# Altium PCB asar_feather.PcbDoc (part 5 of 5)
Units mm, origin at the board's own origin, x right, y up, seen from the top; angles counter-clockwise.
Board outline 50.8 x 22.86 mm, 6 copper layers (Top Layer, L2-GND, L3-SIG, L4-SIG, L5-VCC3V3, Bottom Layer), stack 1.568 mm thick; 181 components, 156 nets, 840 pads, 1779 vias.
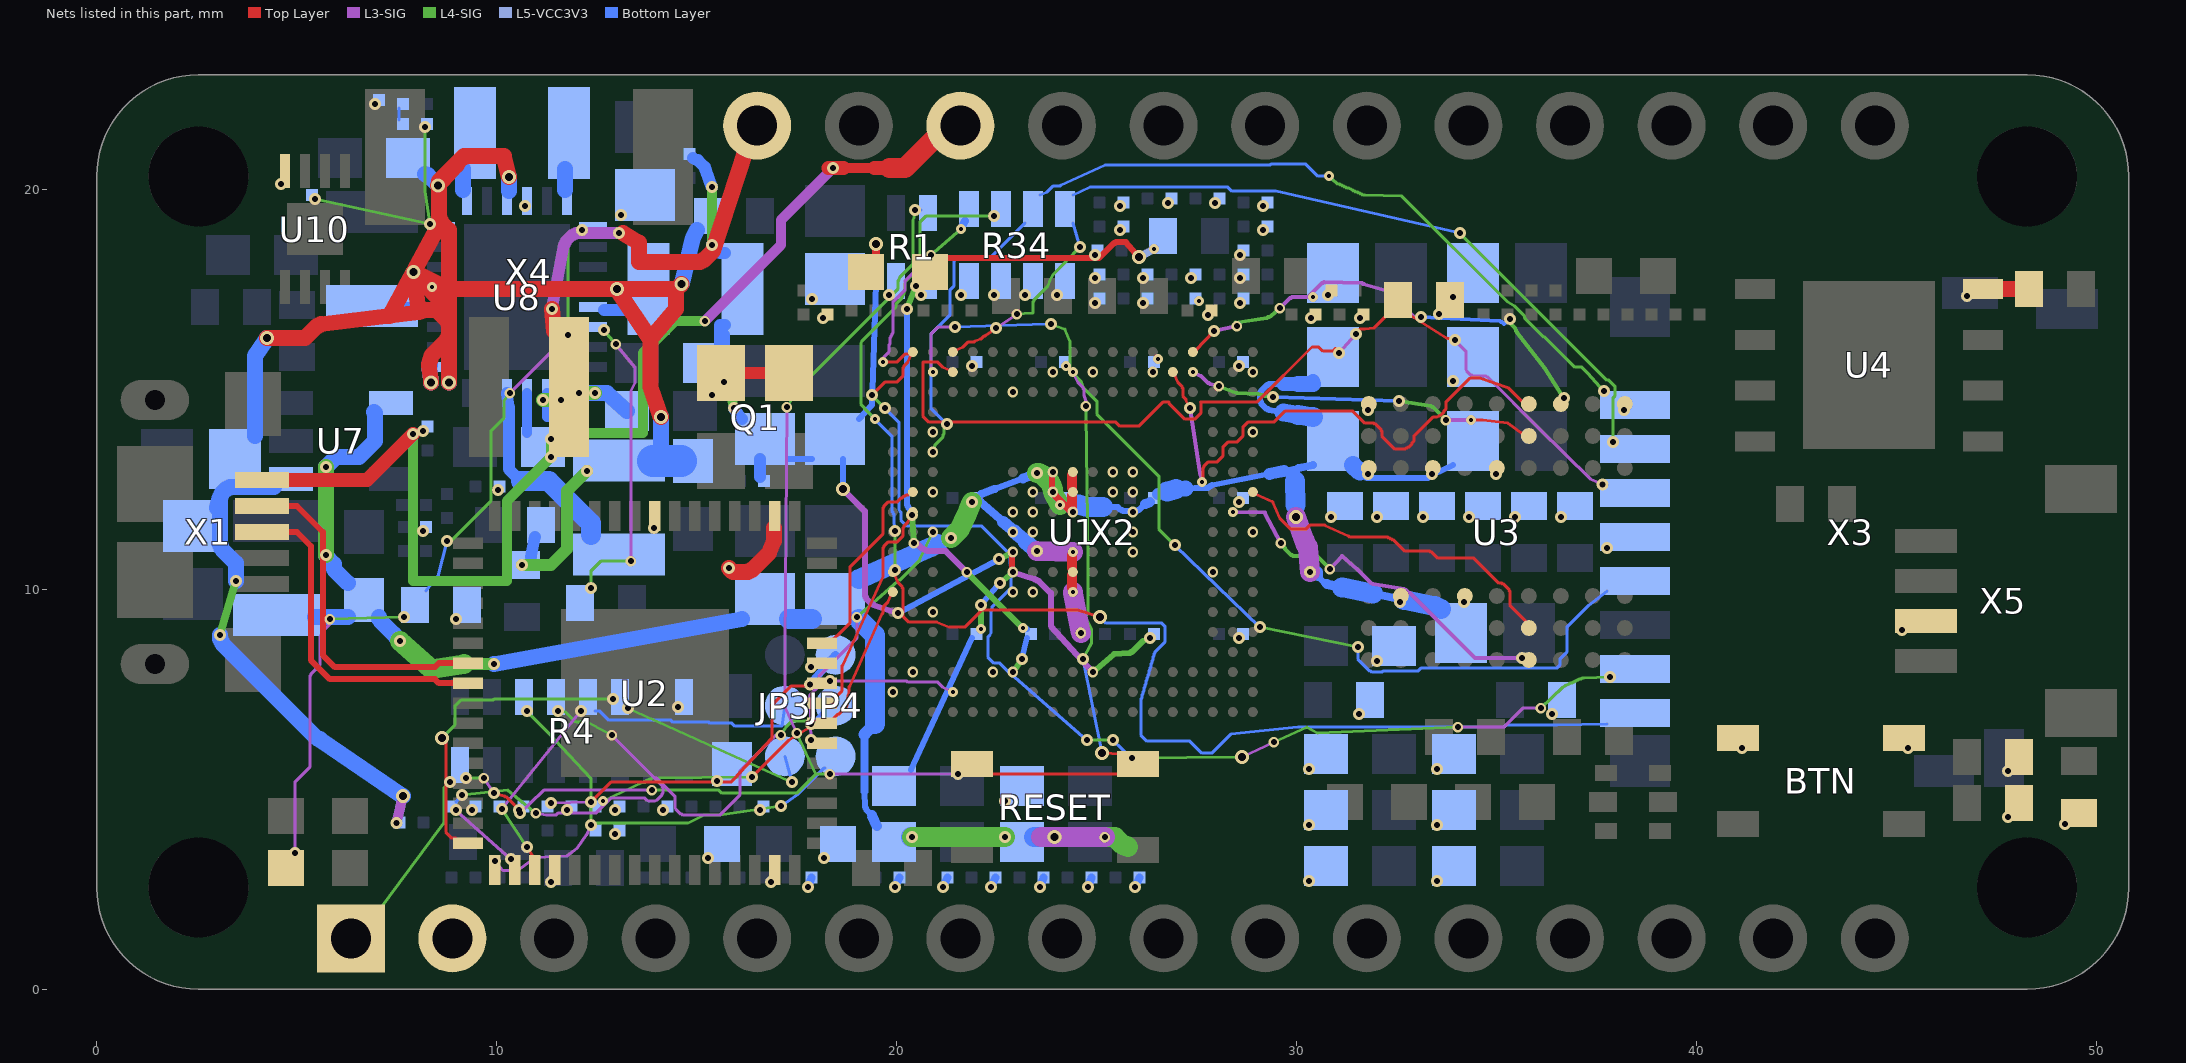
[diagram p8: the nets of this part, all layers, seen from the top]

## Via types
v1: diameter 0.27, hole 0.15, L3-SIG to L4-SIG, tented both sides, 307 vias
v2: diameter 0.3, hole 0.15, L5-VCC3V3 to Bottom Layer, tented both sides, 286 vias
v3: diameter 0.3, hole 0.15, L4-SIG to L5-VCC3V3, tented both sides, 241 vias
v4: diameter 0.3, hole 0.15, Top Layer to L2-GND, tented both sides, 219 vias
v5: diameter 0.3, hole 0.15, L2-GND to L3-SIG, tented both sides, 201 vias
v6: diameter 0.25, hole 0.1, Top Layer to L2-GND, tented both sides, 177 vias
v7: diameter 0.25, hole 0.1, L2-GND to L3-SIG, tented both sides, 125 vias
v8: diameter 0.35, hole 0.2, Top Layer to Bottom Layer, tented both sides, 109 vias
v9: diameter 0.25, hole 0.1, L4-SIG to L5-VCC3V3, tented both sides, 64 vias
v10: diameter 0.25, hole 0.1, L5-VCC3V3 to Bottom Layer, tented both sides, 46 vias
v11: diameter 0.3, hole 0.15, L3-SIG to L4-SIG, tented both sides, 4 vias

## Nets (pads, with @x,y where several pads share a name; then routed paths per layer and width w, separated by ;. In a path a pad name is that pad's centre, name@x,y a point inside that pad or via, vN(x,y) a via of type N, cw(c..) or ccw(c..) an arc to the next point about the centre after c; other vN are vias at no path point) (continued)
PWR_PGOODALL: LD3.A R107.2 U8.15 | length 18.7
  Top Layer w0.076: LD3.A@4.95,3.375 v4(4.95,3.4)
  L3-SIG w0.076: v4(4.95,3.4) 4.95,5.175 5.325,5.55 5.325,7.825 5.35,7.85 5.35,7.875 5.575,8.1 5.575,8.8 5.6,8.825 5.6,8.85 5.625,8.875 5.625,8.9 5.675,8.95 5.675,8.975 5.825,9.125 v1(5.825,9.25) ; v1(10.325,14.9) v1(11.775,16.35)
  L4-SIG w0.076: v1(5.825,9.25) v3(7.675,9.3) ; v3(8.75,11.2) 8.85,11.2 9.85,12.2 9.85,12.3 9.85,13.95 10.175,14.275 10.175,14.7 v1(10.325,14.9) ; v1(11.775,16.35) 11.775,18.625 v3(12.125,18.975)
  Bottom Layer w0.076: R107.2@8.225,9.95 8.525,10.325 v3(8.75,11.2)
  other v2: 7.675,9.3 8.75,11.2 12.125,18.975
  other v5: 4.95,3.4
PWR_PROG: R102.1 U8.20 | length 7.6
  L3-SIG w0.076: v1(12.975,16.125) 13.45,15.55 13.45,15.15 13.35,14.95 v1(13.35,10.7)
  L4-SIG w0.076: v3(12.35,10.025) 12.35,10.45 12.6,10.7 v1(13.35,10.7) ; v3(12.675,16.475) v1(12.975,16.125)
  Bottom Layer w0.076: R102.1@12.35,10 v3(12.35,10.025)
  other v2: 12.35,10.025 12.675,16.475
PWR_SW: L8.1 U8.26 | length 4.8
  Bottom Layer w0.3: U8.26@10.25,14.9 10.3,14.55 10.3,13 10.6,12.7
  Bottom Layer w0.5: 10.6,12.7 11.3,12.7 12.35,11.65 L8.1@12.35,11.35
PWR_SW1: L9.1 U8.4 | length 0.5
  Bottom Layer w0.4: L9.1@7.775,16.975 U8.4@8.325,16.975
PWR_SW2: L2.1 U8.19 | length 0.7
  Bottom Layer w0.3: U8.19@12.675,16.975 13.225,16.975 L2.1@13.35,16.975
PWR_SWAB3: L1.1 U8.9 | length 0.5
  Bottom Layer w0.4: U8.9@9.15,19.975 L1.1@9.15,20.5
PWR_SWCD3: L1.2 U8.14 | length 0.5
  Bottom Layer w0.4: U8.14@11.7,19.975 L1.2@11.7,20.5
PWR_VC3: C164.2 R117.1 U8.8 | length 5.4
  L4-SIG w0.076: v3(5.45,19.75) v3(8.325,19.125) 8.2,19.95 v3(8.2,21.55)
  other v2: 8.325,19.125 5.45,19.75 8.2,21.55
PWR_VC3_RC: C165.1 R117.2 | length 0.3
  Bottom Layer w0.076: R117.2@7.55,21.725 C165.1@7.55,22.025
RAS#: U1.V4 U3.F8 | length 8.7
  Top Layer w0.076: v6(34.35,14.225) 34.65,14.225 35.275,14.15 U3.F8@35.65,13.875
  L3-SIG w0.1: v7@27.4,15.425 27.6,15.325 27.775,15.15 27.8,15.15 27.825,15.125 v1(28.05,15.075) ; v1(33.725,14.225) v6(34.35,14.225)
  L4-SIG w0.1: v1(28.05,15.075) 28.5,14.9 29.025,14.875 29.175,14.85 29.2,14.825 29.225,14.825 v3(29.4,14.8) ; v3(32.55,14.7) 33.35,14.575 33.375,14.55 33.4,14.55 v1(33.725,14.225)
  Bottom Layer w0.1: v3(29.4,14.8) v3(32.55,14.7)
  other v2: 32.55,14.7 29.4,14.8
  other v6: 27.4,15.43
  other v7: 34.35,14.225 27.4,15.43
RST#: R1.2 R4.16 RESET.1 RESET.2 U1.V10 X2.1 | length 46.5
  Top Layer w0.076: v4(9.925,4.9) 10.175,4.825 10.2,4.825 10.225,4.8 10.25,4.8 10.425,4.625 v4(10.575,4.4) ; RESET.1@22.275,5.375 RESET.2@25.625,5.375 ; v8(25.125,5.9) RESET.2@25.625,5.875
  L3-SIG w0.076: v1(9.675,5.275) v4(9.925,4.9) ; v4(10.575,4.4) 11.15,4.95 11.175,4.975 v1(13.875,4.975) ; v1(17.25,14.55) 17.2,8.55 17.2,7.425 17.175,7.4 17.175,7.125 v1(17.5,6.4) ; v1(18.325,5.375) v4(21.525,5.375) ; v7@24.4,15.425 24.525,15.175 24.65,15.05 24.65,15.025 24.675,15 24.675,14.85 24.725,14.7 v1(24.725,14.575)
  L4-SIG w0.076: X2.1@7.025,1.925 8.675,4.15 8.675,5.025 v3(8.825,5.175) ; v3(9.225,5.275) v1(9.675,5.275) ; v1(13.875,4.975) 15.55,4.975 15.625,4.9 17.5,4.9 17.975,5.375 ; v1(17.25,14.55) 17.575,15.05 20.025,17.5 20.025,17.7 20.05,17.725 20.05,17.75 20.075,17.8 20.4,18.125 20.4,19.225 20.425,19.275 v3(20.45,19.475) ; v1(17.5,6.4) 17.975,5.375 ; v1(18.325,5.375) 17.975,5.375 ; v3(24.65,8.25) 24.87,8.65 24.87,9 24.725,9.3 24.75,9.35 24.775,9.4 24.775,10.775 24.729,14.406 ; 24.725,14.4 v1(24.725,14.575)
  Bottom Layer w0.076: v3(8.825,5.175) R4.16@8.9,5.25 ; v3(20.45,19.475) R1.2@20.6,19.475 ; v3(24.65,8.25) v8(25.125,5.9)
  other v2: 8.825,5.175 9.225,5.275 24.65,8.25 20.45,19.475
  other v5: 10.575,4.4 9.925,4.9 21.525,5.375
  other v6: 24.4,15.43
  other v7: 24.4,15.43
SD-CLK: U1.V17 X3.5 | length 24.3
  L3-SIG w0.076: v7@20.9,15.425 20.85,15.475 20.85,16.375 21.025,16.55 v3(21.45,16.55)
  L4-SIG w0.076: v3(23.85,16.625) 24.2,16.5 24.325,16.2 ; 24.325,16.21 24.325,15.475 24.61,15.19 ; 24.6,15.2 24.65,15.05 25,14.7 25,14.375 26.55,12.825 26.55,11.5 v3(26.95,11.1) ; v3(29.075,9.05) v3(31.525,8.55)
  Bottom Layer w0.076: v3(21.45,16.55) 23.775,16.625 v3(23.85,16.625) ; v3(26.95,11.1) v3(29.075,9.05) ; v3(31.525,8.55) 31.525,8.25 31.825,7.95 31.85,7.95 31.875,7.925 32.125,7.925 32.15,7.95 33.025,7.95 33.1,8.025 36.5,8.025 36.575,8.1 36.575,8.25 36.75,8.425 36.75,9.05 37.3,9.6 X3.5@37.75,9.95
  other v1: 21.45,16.55
  other v2: 31.525,8.55 29.075,9.05 26.95,11.1 21.45,16.55 23.85,16.625
  other v6: 20.9,15.43
  other v7: 20.9,15.43
SD-CMD: R35.1 U1.V16 X3.3 | length 22.6
  Top Layer w0.076: U1.V16@21.325,15.475 21.15,15.55 21.025,15.675 20.65,15.675 20.65,14.325 20.8,14.175 25.475,14.175 25.575,14.075 26.05,14.075 26.65,14.675 26.801,14.675 ; 26.8,14.675 26.8,14.65 27.2,14.25 27.45,14.25 27.6,14.4 27.6,14.675 29,14.675 30.382,16.057 ; 30.375,16.05 30.55,16.05 30.65,15.95 30.9,15.95 v4@30.971,16.021 ; v4@30.95,16 v4(31.05,15.9) ; v4(31.475,16.375) 31.475,16.4 31.575,16.5 ; 31.587,16.5 31.7,16.5 31.925,16.525 R35.1@32.275,16.875 ; R35.1@32.8,16.875 33.75,16.271 ; 33.75,16.275 v4(33.95,16.225)
  L3-SIG w0.076: v4(31.05,15.9) v4(31.475,16.375) ; v4(33.95,16.225) 34.225,15.95 34.225,15.5 34.25,15.45 34.35,15.35 34.375,15.35 34.4,15.325 34.725,15.325 34.775,15.3 ; 34.77,15.305 36.05,14.025 37.35,12.75 v1(37.645,12.62)
  Bottom Layer w0.076: v1(37.645,12.62) X3.3@37.75,12.6
  other v2: 37.645,12.62
  other v3: 37.645,12.62
  other v5: 31.05,15.9 33.95,16.225 31.475,16.375
SD-DAT0: R34.1 U1.W18 X3.7 | length 33.2
  Top Layer w0.076: v1(19.375,14.85) 19.7,15.175 20,15.175 20.15,15.325 20.15,15.525 20.175,15.55 20.175,15.575 20.275,15.675 U1.W18@20.35,15.85 ; v6(19.65,15.675) 20,15.675 20.2,15.875 U1.W18@20.325,15.875
  L3-SIG w0.076: v6(19.65,15.675) 19.675,15.8 19.8,15.925 19.8,16.1 19.825,16.125 19.825,16.275 19.85,16.3 19.85,16.325 19.875,16.35 19.875,16.375 19.9,16.4 19.9,17.175 20.2,17.475 20.2,17.7 v1(20.85,18.35) ; v8(28.625,5.8) v1(29.425,6.175) ; v1(34.025,6.55) 35.175,6.55 35.65,7.025 v1(36.1,7.025)
  L4-SIG w0.076: v1(19.375,14.85) v3(19.7,14.525) ; v1(20.85,18.35) v9(21.6,19) ; v3(24.75,6.225) v3(25.4,6.225) ; v3(25.875,5.775) v8(28.625,5.8) ; v1(29.425,6.175) 30.25,6.55 30.525,6.4 v1(34.025,6.55) ; v1(36.1,7.025) 36.65,7.55 36.7,7.575 36.725,7.6 36.75,7.6 36.8,7.625 36.825,7.65 36.875,7.65 36.9,7.675 36.925,7.675 36.95,7.7 36.975,7.7 37,7.725 37.025,7.725 37.05,7.75 37.1,7.75 37.125,7.775 37.175,7.775 v3(37.825,7.8)
  Bottom Layer w0.076: v3(19.7,14.525) 20.05,14.175 20.05,12 20.075,11.95 20.1,11.925 20.1,11.725 20.25,11.575 22.125,11.575 22.825,10.875 22.825,10.625 22.85,10.6 22.85,10.025 22.375,9.55 22.375,9.475 22.35,9.45 22.35,8.9 22.325,8.85 22.275,8.8 22.275,8.3 22.425,8.15 22.575,8.15 22.9,7.825 22.95,7.8 v3(24.75,6.225) ; v3(25.4,6.225) v3(25.875,5.775)
  Bottom Layer w0.2: v9(21.6,19) R34.1@21.7,19.2
  other v2: 25.875,5.775 24.75,6.225 25.4,6.225 37.825,7.8 19.7,14.525
  other v4: 19.375,14.85
  other v5: 19.375,14.85
  other v7: 19.65,15.675
  other v10: 21.6,19
SD-DAT1: R34.2 U1.H19 X3.8 | length 34.6
  Top Layer w0.076: U1.H19@19.95,10.35 20.025,10.175 20.125,10.075 20.125,10.05 20.15,10.025 20.15,9.325 20.3,9.175 21,9.175 21.312,9.05 21.7,9.05 22.125,9.475 24.525,9.475 v8(25.075,9.3)
  L4-SIG w0.076: v9(19.45,14.25) 19.1,14.625 19.1,16.15 19.125,16.2 19.975,17.05 19.975,17.125 20.125,17.275 20.125,17.3 20.15,17.325 20.15,17.35 20.175,17.375 20.175,17.425 20.2,17.45 20.2,17.65 20.225,17.7 20.575,18.05 20.575,19.175 20.725,19.325 v3(22.425,19.325) ; v4(19.95,10.475) v3(19.95,11.45)
  Bottom Layer w0.076: v9(19.45,14.25) 19.875,13.825 19.875,11.95 19.9,11.925 19.9,11.9 19.925,11.875 19.925,11.675 v3(19.95,11.45) ; v8(25.075,9.3) 25.225,9.15 26.625,9.15 26.7,9.075 26.7,8.675 26.45,8.425 26.45,8.4 26.425,8.375 26.425,8.325 26.4,8.3 26.4,8.225 26.375,8.2 26.375,8.15 26.35,8.125 26.35,8.05 26.325,8.025 26.325,7.975 26.3,7.95 26.3,7.875 26.275,7.85 26.275,7.8 26.25,7.775 26.25,7.725 26.225,7.7 26.225,7.625 26.2,7.6 26.2,7.55 26.175,7.525 26.175,7.45 26.15,7.425 26.15,7.375 26.125,7.35 26.125,7.275 26.1,7.25 26.1,6.35 26.25,6.2 27.325,6.2 27.625,5.9 27.875,5.9 28.35,6.375 30.025,6.55 35.175,6.55 35.225,6.6 36.5,6.6 X3.8@37.75,6.625
  other v1: 19.95,10.475
  other v2: 19.95,11.45 22.425,19.325
  other v5: 19.95,10.475
  other v10: 19.45,14.25
SD-DAT2: R34.3 U1.P17 X3.1 | length 24.2
  L4-SIG w0.076: v1@20.9,13.425 20.95,13.6 21.15,13.8 21.15,13.85 21.175,13.875 21.175,14.05 v3(21.25,14.125) ; v9(30.8,20.325) 31,20.15 31.025,20.125 31.075,20.125 31.1,20.1 31.125,20.1 31.15,20.075 31.175,20.075 31.2,20.05 31.225,20.05 31.25,20.025 31.3,20.025 31.35,20 31.4,19.975 31.425,19.95 31.45,19.95 31.475,19.925 31.525,19.925 31.55,19.9 31.575,19.9 31.6,19.875 31.625,19.875 31.65,19.85 31.7,19.85 32.625,19.825 35.253,17.197 ; 35.25,17.2 35.45,17.075 35.675,16.85 35.7,16.775 36.175,16.3 36.2,16.3 36.95,15.55 37.125,15.55 37.275,15.4 v3(37.675,14.95)
  Bottom Layer w0.076: v3(21.25,14.125) 20.85,14.525 20.85,16.375 21.325,16.85 21.325,17.475 21.425,17.575 21.425,18.2 21.5,18.275 22.325,18.275 R34.3@23.2,19.15 ; R34.3@23.575,19.85 23.75,19.925 23.9,20.075 24.075,20.075 24.1,20.1 25.2,20.6 29.325,20.6 29.35,20.625 30.225,20.625 30.525,20.325 v9(30.8,20.325) ; v3(37.675,14.95) X3.1@37.75,14.875
  other v1: 20.9,13.43
  other v2: 21.25,14.125 37.675,14.95
  other v6: 20.9,13.43
  other v7: 20.9,13.43
  other v10: 30.8,20.325
SD-DAT3: R34.4 U1.W16 X3.2 | length 21.7
  Top Layer w0.076: U1.W16@21.475,15.975 21.65,16.05 21.775,16.175 21.925,16.175 21.95,16.2 22.075,16.25 22.1,16.25 22.175,16.325 22.2,16.325 22.225,16.35 v4(22.475,16.525)
  L3-SIG w0.076: v4(22.475,16.525) v1(23,16.875)
  L4-SIG w0.076: v1(23,16.875) 23.375,16.9 23.4,16.9 23.4,17.175 23.425,17.2 23.425,17.225 23.775,17.575 23.825,17.7 ; 23.813,17.7 23.9,17.85 ; 23.903,17.861 v3(24.575,18.55) ; v3(34.075,18.9) 37.75,15.225 37.8,15.225 37.95,15.075 37.95,14.825 37.9,14.775 v3(37.9,13.675)
  Bottom Layer w0.076: R34.4@24.4,19.15 v3(24.575,18.55) ; R34.4@24.4,19.85 24.825,20.05 28.275,20.05 28.375,19.95 29.475,19.95 v3(34.075,18.9)
  other v2: 37.9,13.675 24.575,18.55 34.075,18.9
  other v5: 22.475,16.525
SDRAM-CLK: U1.M1 U3.F2 | length 8.4
  Top Layer w0.076: U1.M1@28.975,12.375 29.392,12.187 ; 29.4,12.175 29.575,11.775 29.85,11.5 30.225,11.5 30.325,11.6 30.7,11.6 ; 30.692,11.6 31.3,11.325 31.325,11.3 32.275,11.3 32.3,11.275 32.325,11.275 32.35,11.25 32.375,11.25 32.4,11.225 32.425,11.225 32.7,10.95 33.325,10.95 33.35,10.925 33.375,10.925 33.525,10.775 34.425,10.775 35.05,10.15 35.125,10.15 35.15,10.125 35.175,10.125 35.3,10 35.3,9.975 35.325,9.95 35.325,9.6 U3.F2@35.75,9.175
SDRAM-CS#: U1.W4 U3.G9 | length 11.3
  Top Layer w0.076: U1.W4@27.475,15.975 v4(27.925,16.45)
  L3-SIG w0.1: v4(27.925,16.45) v1(28.5,16.575) ; v1(29.575,17.025) 29.825,17.275 29.85,17.275 29.875,17.3 30.275,17.3 30.625,17.65 30.65,17.65 30.675,17.675 31.625,17.65 31.65,17.625 31.675,17.625 32.2,17.475 32.225,17.45 32.25,17.45 32.3,17.425 32.925,16.8 v3(33.1,16.8)
  L4-SIG w0.1: v1@28.473,16.662 29.25,16.775 29.275,16.8 29.3,16.8 29.35,16.825 v1(29.575,17.025) ; v1@28.475,16.65 v1(28.5,16.575) ; v3(35.325,16.75) 35.325,16.65 35.45,16.525 35.475,16.475 35.475,16.45 35.5,16.425 36.2,15.52 v4(36.675,14.775)
  Bottom Layer w0.1: v3(33.1,16.8) 35.075,16.7 35.1,16.675 35.125,16.675 35.175,16.625 v3(35.325,16.75)
  other v1: 36.675,14.775 33.1,16.8
  other v2: 35.325,16.75 33.1,16.8
  other v5: 36.675,14.775 27.925,16.45
TCK: JP3.1 R4.6 U2.16 | length 12.9
  Top Layer w0.076: v8(8.625,6.275) 8.725,6.175 8.725,3.925 8.875,3.775 8.975,3.775 U2.16@9,3.75
  L4-SIG w0.076: v8(8.625,6.275) 8.95,6.6 8.95,7.075 9.1,7.225 9.9,7.225 9.925,7.25 v3(12.9,7.25) ; v3(13.275,7.025) v3(17.375,5.175)
  Bottom Layer w0.076: R4.6@13.25,7.025 v3(13.275,7.025) ; JP3.1@17.2,5.82 v3(17.375,5.175)
  other v2: 17.375,5.175 13.275,7.025 12.9,7.25
TDI: JP4.1 R4.3 R90.1 U2.17 | length 12.8
  L3-SIG w0.076: v4(9.95,3.2) 10.15,2.97 10.53,2.97 10.95,3.29 11.75,3.33 11.94,3.47 12.01,3.53 12.24,3.85 v3(12.35,4.1)
  L4-SIG w0.076: v3(10.75,6.95) 11.275,6.425 12.35,5.275 v3(12.35,4.1) ; v1@12.35,4.15 14.775,4.15 15.175,4.35 15.575,4.35 v3(17.1,4.575)
  Bottom Layer w0.076: R90.1@12.35,4.075 v3(12.35,4.1) ; v3(17.1,4.575) 17.525,4.875 18.175,5.525 JP4.1@18.2,5.525
  other v1: 12.35,4.1
  other v2: 12.35,4.1 17.1,4.575 10.75,6.95
  other v5: 9.95,3.2
TDO: JP4.2 R4.4 R91.1 U2.18 | length 17.3
  L3-SIG w0.076: v1(8.975,4.475) v4(10.35,3.25) ; v1(10.975,4.4) 11.225,4.35 11.475,4.35 11.525,4.4 12.475,4.4 12.85,4.775 13.7,4.775 13.75,4.725 13.8,4.7 13.95,4.7 14,4.725 14.125,4.85 14.125,4.875 14.15,4.9 14.15,5.05 14.125,5.075 14.125,5.1 v1(12.875,6.35) ; 13.95,5.275 14,5.275 14.45,4.825 14.45,4.55 14.475,4.5 14.6,4.375 14.625,4.375 14.65,4.35 15.575,4.35 16.075,4.85 16.075,5.45 16.975,6.35 v1(17.1,6.35)
  L4-SIG w0.076: v3(9.125,4.85) 10.275,4.975 v1(10.975,4.4) ; v3(11.525,6.95) 11.725,6.925 11.975,6.675 12.275,6.675 v1(12.875,6.35) ; v1(17.1,6.35) 17.2,6.5 17.225,6.55 17.35,6.675 17.4,6.7 17.775,6.7 v3(17.85,6.625)
  Bottom Layer w0.076: R91.1@8.975,4.675 v3(9.125,4.85) ; v3(17.85,6.625) JP4.2@18.125,6.9
  other v2: 8.975,4.475 9.125,4.85 17.85,6.625 11.525,6.95
  other v3: 8.975,4.475
  other v5: 10.35,3.25
TMS: JP3.2 R4.5 R92.1 U2.19 | length 10
  Top Layer w0.076: v4(10.75,3.55) U2.19@10.95,3.25
  L3-SIG w0.076: v3(10.125,4.5) v1(12.1,6.95)
  L4-SIG w0.076: v3(10.125,4.5) v4(10.75,3.55)
  Bottom Layer w0.076: R4.5@12.45,6.95 12.575,6.95 12.8,6.725 14.35,6.725 14.4,6.675 15.3,6.675 15.325,6.65 15.875,6.65 15.95,6.575 17.125,6.575 JP3.2@17.2,7.09
  other v1: 10.75,3.55 10.125,4.5
  other v2: 10.125,4.5 12.1,6.95
  other v3: 12.1,6.95
  other v5: 10.75,3.55
UART_FT_CTS#: R93.1 U1.B16 U2.41 | length 11.4
  Top Layer w0.076: v4(12.35,4.675) 12.85,5.175 15.85,5.175 15.925,5.25 16.875,6.275 16.875,7.1 17.35,7.575 U2.41@17.85,7.575
  L3-SIG w0.076: v1(11.35,4.65) v4(12.35,4.675) ; v4(18.325,7.7) 20.25,7.7 20.275,7.675 21.025,7.675 21.15,7.55 v7@21.4,7.425
  other v2: 11.35,4.65
  other v3: 11.35,4.65
  other v5: 12.35,4.675 18.325,7.7
  other v6: 21.4,7.43
  other v7: 21.4,7.43
UART_FT_DTR#: U1.M18 U2.43 | length 4.6
  Top Layer w0.076: U2.43@18.4,8.75 18.55,8.875 18.825,9.15 18.825,10.55 19.65,11.375 19.65,12.025 19.675,12.05 19.675,12.075 19.775,12.175 20,12.175 20.1,12.275 20.125,12.275 20.175,12.325 20.2,12.325 20.225,12.35 20.275,12.35 20.3,12.375 U1.M18@20.325,12.375
UART_FT_RTS#: U1.L18 U2.40 | length 5.3
  Top Layer w0.076: U2.40@18.4,7.25 18.55,7.375 18.625,7.45 18.625,8.075 18.65,8.1 19.65,10.3 19.65,11.025 19.675,11.05 19.675,11.075 19.775,11.175 20,11.175 20.15,11.325 20.15,11.525 20.175,11.55 20.175,11.575 20.275,11.675 U1.L18@20.35,11.85
UART_FT_RXD: R94.1 U1.G19 U2.39 | length 9.4
  Top Layer w0.076: v4(16.375,5.3) 17.3,6.225 17.825,6.55 U2.39@17.85,6.55 ; U2.39@18.4,6.75 18.525,6.875 18.55,6.875 18.75,7.075 18.775,7.35 18.8,7.4 18.8,7.55 18.825,7.575 19.625,9.375 19.65,9.4 19.65,9.525 19.675,9.55 19.675,9.575 19.775,9.675 U1.G19@19.85,9.85
  L4-SIG w0.076: v9(12.65,4.7) 13.65,5.175 13.7,5.175 13.75,5.225 13.8,5.25 13.85,5.25 13.875,5.275 v4(16.375,5.3)
  Bottom Layer w0.076: R94.1@12.575,4.675 v9(12.65,4.7)
  other v1: 16.375,5.3
  other v5: 16.375,5.3
  other v10: 12.65,4.7
UART_FT_TXD: U1.K17 U2.38 | length 6.5
  L3-SIG w0.076: v4(17.85,6.225) 17.825,7.1 17.8,7.15 17.8,7.3 17.825,7.35 18.05,7.575 18.05,7.825 19,8.775 v1(19,9.3)
  L4-SIG w0.076: v1(19,9.3) 20.025,10.2 20.05,10.225 20.075,10.225 20.575,10.725 20.575,10.75 v1@20.9,11.425
  other v1: 20.9,11.43
  other v5: 17.85,6.225
  other v6: 20.9,11.43
  other v7: 20.9,11.43
UDQM: U1.L2 U3.F1 | length 9.1
  Top Layer w0.076: v4(35.625,8.275) U3.F1@35.65,8.275
  L3-SIG w0.1: v7@28.4,11.925 29.209,11.912 ; 29.2,11.9 v1(29.6,11.15) ; v1(30.825,10.5) 31.125,10.825 ; 31.132,10.833 31.5,10.5 31.85,10.15 31.9,10.125 32.675,10 32.725,9.975 32.8,9.9 32.825,9.9 34.45,8.275 v4(35.625,8.275)
  L4-SIG w0.1: v1(29.6,11.15) 29.675,11.05 29.7,11.025 29.7,11 29.85,10.85 29.875,10.85 29.9,10.825 30.5,10.825 v1(30.825,10.5)
  other v5: 35.625,8.275
  other v6: 28.4,11.93
  other v7: 28.4,11.93
USB5V0: C150.2 U8.25 X1.1 X2.19 | length 29
  Top Layer w0.25: 18.673,20.525 19.436,20.525
  Top Layer w0.35: 4.8,12.73 6.75,12.73 v4(7.9,13.88) ; v4@18.291,20.525 18.673,20.525 ; 19.436,20.525 19.818,20.525
  Top Layer w0.5: 19.818,20.525 20.2,20.525 X2.19@20.975,21.3
  L3-SIG w0.25: v1(15.2,16.7) 17.1,18.6 17.1,19.225 v4(18.4,20.525)
  L4-SIG w0.25: v4(7.9,13.88) 7.9,10.2 10.25,10.2 10.25,12.2 v3(11.35,13.3) v3(11.35,13.75) 11.5,13.9 13.65,13.9 13.65,15.9 14.45,16.7 v1(15.2,16.7)
  Bottom Layer w0.25: C150.2@10.75,13.9 U8.25@10.75,14.9
  other v1: 7.9,13.88
  other v2: 11.35,13.3 11.35,13.75
  other v5: 7.9,13.88 18.4,20.525
USB_D_N: U2.7 X1.2 | length 8
  Top Layer w0.15: 4.8,12.08 5,12.08 5.65,11.43 5.65,8.35 5.95,8.05 8.45,8.05 8.55,8.15 U2.7@9.275,8.15
USB_D_P: U2.8 X1.3 | length 7.7
  Top Layer w0.15: 4.8,11.43 5,11.43 5.35,11.08 5.35,8.226 5.826,7.75 8.45,7.75 8.55,7.65 U2.8@9.275,7.65
VBATT: C151.2 U8.23 X2.17 X4.1 | length 12.3
  Top Layer w0.4: v4(11.375,17) X4.1@11.425,16.45 ; v4@13.15,18.903 13.55,18.662 13.55,18.175 15.075,18.175 15.1,18.2 15.125,18.2 15.15,18.225 15.175,18.225 15.4,18.45 X2.17@16.225,20.975
  L3-SIG w0.3: v4(11.375,17) 11.675,18.6 11.7,18.625 11.7,18.65 11.725,18.675 11.725,18.7 11.875,18.85 11.9,18.85 11.925,18.875 11.95,18.875 11.975,18.9 v4(13.05,18.9)
  L4-SIG w0.35: v4(11.15,14.725) v4(11.6,14.725) v3(12.05,14.9) v3(12.45,14.9)
  Bottom Layer w0.4: U8.23@11.75,14.9 12.75,14.9 C151.2@13.25,14.45
  other v2: 12.05,14.9 12.45,14.9
  other v5: 11.15,14.725 11.6,14.725 11.375,17 13.05,18.9
  other v11: 11.15,14.725 11.6,14.725
VCC1V0: C84.2 C85.1 C86.1 C87.1 C88.1 C89.1 C90.1 C91.1 C92.1 C140.1 C141.1 C142.1 C143.1 L3.2 U1.G10 U1.H10 U1.J10 U1.L10 U1.M10 U1.M11 U1.N10 U1.N11 U7.4 | length 57.9
  Top Layer w0.15: U1.M11@23.875,12.525 U1.N11@23.875,12.85
  Top Layer w0.2: U1.M11@23.95,12.35 U1.L10@24.325,11.975
  Top Layer w0.25: U1.G10@24.375,10.025 U1.H10@24.375,10.35 ; U1.H10@24.375,10.525 U1.J10@24.375,10.85 ; U1.L10@24.375,12.025 U1.M10@24.375,12.35 ; U1.M10@24.375,12.525 U1.N10@24.375,12.85
  L3-SIG w0.5: v3(23.5,10.95) v7@24.4,10.925 ; v8(23.938,3.8) 23.6,3.8 v1(25.2,3.8) ; v7@24.4,9.925 v1(24.6,8.905) ; v8(29.975,11.8) 30.175,11.225 30.2,11.2 30.2,11.15 30.225,11.1 30.275,11.05 30.275,11.025 v1(30.325,10.425)
  L4-SIG w0.3: 9.175,8.125 v3(9.925,8.125)
  L4-SIG w0.4: v3(5.725,10.85) v3(5.725,13.05)
  L4-SIG w0.5: v2(7.575,8.7) 8.36,8 9.175,8.125 ; v3(20.375,3.8) v3(22.7,3.8) ; v3(21.35,11.275) 21.575,11.5 21.75,11.875 21.775,11.95 21.8,12 v3(21.875,12.175) ; v3(23.5,12.9) 23.55,12.9 23.575,12.875 23.6,12.875 23.625,12.85 23.65,12.85 23.825,12.675 23.85,12.625 23.85,12.6 23.875,12.575 23.875,12.525 23.9,12.5 23.9,12.425 v9(24.075,12.1) ; v1(25.2,3.8) 25.45,3.8 25.65,3.6 25.675,3.6 25.7,3.575 25.75,3.575 25.775,3.55
  Bottom Layer w0.15: 19.188,4.942 19.2,4.55 19.225,4.525 19.225,4.5 19.375,4.35 ; 22.45,12.506 23.15,12.769 ; 25.15,12.05 25.525,12.05 25.6,11.975 25.625,11.975 25.65,11.95 26,11.95 26.025,11.975 26.05,11.975 26.2,12.125 ; 27.213,12.512 27.45,12.525 27.775,12.525 27.825,12.575 27.85,12.575 27.875,12.6 29.318,12.886 ; 29.667,14.417 29.3,14.475 29.275,14.5 29.25,14.5 29.1,14.65 29.1,14.675 29.075,14.7 29.075,14.9 29.1,14.925 29.1,14.95 29.25,15.1 29.275,15.1 29.3,15.125 29.667,15.125 ; 29.679,12.957 30.039,13.029 ; 29.95,13 29.956,12.7 ; 30.525,10.325 30.7,10.15 ; 31.575,12.938 31.75,12.775 33.275,12.775 33.3,12.8 33.325,12.8 33.4,12.875 33.425,12.875 C142.1@33.9,13.1
  Bottom Layer w0.2: 19.188,4.942 19.19,6.37 ; C91.1@22.1,12.175 22.66,11.685 ; C91.1@22.1,12.375 22.45,12.506 ; 30.039,13.029 C141.1@30.4,13.1 ; 30.7,10.15 30.725,10.15 30.75,10.125 ; 31.907,9.889 32.679,9.732
  Bottom Layer w0.25: 19.375,4.35 C87.1@19.5,4.075 ; 23.15,12.769 v3(23.5,12.9) ; 26.2,12.125 C90.1@26.325,12.175 ; 30.5,10.375 30.525,10.35 30.525,10.325 ; 30.75,10.125 31.136,10.046
  Bottom Layer w0.3: 19.19,6.37 19.45,6.63 ; 21.021,11.129 v3(21.35,11.275) ; 22.66,11.685 22.94,11.44 ; v9(24.075,12.1) C89.1@24.1,12.175 ; C89.1@24.325,12.175 24.55,12.113 ; C90.1@26.525,12.375 26.75,12.438 ; 29.318,12.886 29.679,12.957 ; v1(30.325,10.425) 30.5,10.425 30.5,10.375
  Bottom Layer w0.35: 22.94,11.44 23.22,11.195 ; 29.667,15.125 30.033,15.125 ; 29.969,12.1 v8(29.975,11.8) ; C143.1@30.4,15.1 C143.1@30.4,15.2
  Bottom Layer w0.4: L3.2@5.45,9.3 C84.2@6.275,9.3 ; v3(5.725,10.85) 5.8,10.75 5.925,10.625 5.925,10.5 C84.2@6.275,10.15 ; v3(5.725,13.05) 5.975,13.3 6.55,13.3 6.95,13.7 6.95,14.4 U7.4@6.925,14.425 ; C84.2@7.05,9.3 7.075,9.225 7.425,8.875 v2(7.575,8.7) ; v3(9.925,8.125) C85.1@16.125,9.25 ; 23.22,11.195 v3(23.5,10.95) ; 26.975,12.5 27.213,12.512 ; 30.033,15.125 C143.1@30.4,15.125
  Bottom Layer w0.45: 29.667,14.417 30.033,14.358 ; C141.1@31.4,13.1 31.575,12.938
  Bottom Layer w0.5: C85.1@17.3,9.25 C86.1@17.875,9.25 ; C86.1@19.05,9.25 19.45,8.85 19.45,6.63 ; C86.1@19.05,10.25 21.021,11.129 ; C87.1@20.35,3.8 v3(20.375,3.8) ; C88.1@23.43,3.8 v8(23.938,3.8) ; 24.55,12.113 24.775,12.05 25.15,12.05 ; 26.75,12.438 26.975,12.5 ; 29.956,12.7 29.969,12.1 ; 30.033,14.358 C141.1@30.4,14.3 ; 31.136,10.046 31.907,9.889 ; 32.679,9.732 33.45,9.575 C140.1@33.6,9.5
  other v1: 23.5,10.95 24.4,11.93 23.9,12.43 23.9,12.93
  other v2: 20.375,3.8 22.7,3.8 9.925,8.125 30.325,10.425 5.725,10.85 23.5,10.95 21.35,11.275 21.875,12.175 23.5,12.9 5.725,13.05
  other v3: 7.575,8.7 30.325,10.425
  other v6: 24.4,9.93 24.4,10.93 24.4,11.93 23.9,12.43 23.9,12.93
  other v7: 24.4,9.93 24.4,10.93 24.4,11.93 23.9,12.43 23.9,12.93
  other v9: 24.6,8.905
  other v10: 24.6,8.905 24.075,12.1
VCC1V8: C82.2 C93.1 C94.1 C95.1 C96.1 C144.1 C163.1 L2.2 L7.1 R113.1 U1.C9 U1.H13 U1.J13 | length 30.2
  Top Layer w0.15: U1.H13@22.875,10.525 U1.J13@22.875,10.85
  Top Layer w0.2: L7.1@19.475,17.625 v8(19.475,18.635)
  L3-SIG w0.15: v8(18.65,12.5) 19.2,11.95 19.2,9.825 19.225,9.8 19.225,9.775 19.375,9.625 19.4,9.625 19.425,9.6 v1(20.025,9.4) ; v1@22.9,10.425 23.45,10.25 23.475,10.225 23.5,10.225 23.525,10.2 23.55,10.2 23.85,9.9 23.85,9.075 v1@24.9,7.925
  L4-SIG w0.15: v9(22.1,9) v3(22.1,9.6) ; v3(22.55,10.75) v1@22.9,10.925 ; v3(22.575,10.15) v1@22.9,10.425 ; v1@24.9,7.925 25.425,8.375 25.825,8.4 25.85,8.425 25.875,8.425 26.15,8.7 v3(26.325,8.775)
  L4-SIG w0.25: v3(15.375,18.6) v3(15.375,20.05) ; v3(15.675,15.175) 15.825,15.025 v3(15.925,14.525)
  Bottom Layer w0.15: C93.1@17.3,13.25 C144.1@17.875,13.25 ; v8(18.65,12.5) C144.1@18.65,13.25 ; C144.1@19.05,14.25 19.375,14.6 19.475,17.625 ; v1(20.025,9.4) v3(22.55,10.75) ; C94.1@20.35,5.475 C95.1@21.875,8.775 ; v3(22.1,9.6) v3(22.575,10.15)
  Bottom Layer w0.2: 19.475,17.625 v8(19.475,18.635)
  Bottom Layer w0.3: C163.1@14.9,20.775 15,20.725 15.025,20.725 15.2,20.55 15.2,20.5 15.225,20.475 v3(15.375,20.05) ; v3(15.375,18.6) 15.575,18.4 L2.2@15.7,18.4 ; C82.2@15.575,16.025 15.575,16.6 L2.2@15.7,16.6 ; C82.2@15.625,15.275 v3(15.675,15.175) ; C82.2@15.68,16.14 L2.2@15.68,16.36 ; v3(15.925,14.525) C93.1@16.125,14.25 ; R113.1@16.575,12.8 C93.1@16.575,13.25
  other v1: 24.9,7.93 22.9,10.43 22.9,10.93
  other v2: 26.325,8.775 20.025,9.4 22.1,9.6 22.575,10.15 22.55,10.75 15.925,14.525 15.675,15.175 15.375,18.6 15.375,20.05
  other v3: 20.025,9.4
  other v6: 24.9,7.93 22.9,10.43 22.9,10.93
  other v7: 24.9,7.93 22.9,10.43 22.9,10.93
  other v10: 22.1,9
VCC3V3: BTN.1 BTN.2 C3.2 C4.2 C5.2 C6.2 C7.2 C8.2 C9.2 C11.2 C12.2 C13.2 C38.2 C80.2 C97.1 C98.1 C99.1 C100.1 C101.1 C102.1 C103.1 C104.1 C105.1 C106.1 C107.1 C108.1 C109.1 C110.1 C111.1 C112.1 C113.1 C114.1 C115.1 C116.1 C117.1 C118.1 C119.1 C120.1 C121.1 C122.1 C133.2 C134.2 C135.2 C136.2 C137.2 C138.2 C145.1 C146.1 C155.2 C156.2 C157.2 C158.2 C159.2 JP4.3 L4.2 L5.2 Q1.1 Q1.4 R1.3 R1.4 R2.2 R4.8 R6.2 R7.2 R19.2 R20.2 R23.1 R34.5 R34.6 R34.7 R34.8 R35.2 R80.1 R81.1 R82.1 R90.2 R91.2 R92.2 R93.2 R94.2 R96.2 R97.2 R98.2 R99.2 R107.1 R115.1 R118.1 U1.B19 U1.C14 U1.C18 U1.F17 U1.G12 U1.G13 U1.H3 U1.J7 U1.K1 U1.K7 U1.K12 U1.K13 U1.L7 U1.L12 U1.L13 U1.M7 U1.M8 U1.M12 U1.M17 U1.N7 U1.N8 U1.R1 U1.R17 U1.U13 U1.V1 U1.V6 U1.V9 U1.V11 U2.20 U2.31 U2.42 U2.50 U2.56 U3.A7 U3.A9 U3.B3 U3.C7 U3.D3 U3.E7 U3.J9 U4.8 U8.12 U10.8 X2.2 X3.4 X5.2 | length 7.6
  Top Layer w0.3: Q1.1@15.61,15.4 Q1.4@17.31,15.4
  Top Layer w0.4: v4(15.8,10.525) 15.9,10.425 16.275,10.425 16.3,10.45 16.325,10.45 16.35,10.475 16.375,10.475 16.8,10.9 16.925,11.2 U2.50@16.925,11.525 ; U4.8@47.15,17.505 C11.2@48.3,17.505
  Bottom Layer w0.2: v2(17.775,2.55) R19.2@17.87,2.795 ; v2(17.835,7.62) JP4.3@18.47,8.36 ; v2(19.95,2.55) C155.2@20.07,2.795 ; v2(21.15,2.55) C156.2@21.27,2.795 ; v2(22.35,2.55) C157.2@22.47,2.795 ; v2(23.575,2.55) C158.2@23.67,2.795 ; v2(24.775,2.55) C159.2@24.87,2.795 ; v2(25.95,2.55) C38.2@26.07,2.795
  other v1: 11.35,2.675 16.85,2.675 49.2,4.125 47.775,4.3 47.775,5.45 41.125,6.025 45.275,6.025 19.9,7.43 20.4,7.93 22.4,7.93 17.85,8.05 45.125,8.975 20.9,9.43 32.575,9.675 34.175,9.675 22.9,9.93 23.4,9.93 27.9,10.43 15.8,10.525 25.9,10.93 22.9,11.43 23.4,11.43 25.9,11.43 28.9,11.43 13.925,11.525 22.9,11.93 23.4,11.93 25.9,11.93 20.9,12.43 23.4,12.43 25.4,12.43 25.9,12.43 31.775,12.875 33.375,12.875 34.975,12.875 25.4,12.93 25.9,12.93 20.9,13.93 28.9,13.93 31.775,14.475 38.175,14.475 15.375,14.85 22.9,14.93 23.9,15.43 24.9,15.43 26.4,15.43 28.9,15.43 18.15,16.775 30.35,16.775 31.575,16.775 27.775,16.85 33.55,16.875 46.75,17.325 30.775,17.35 4.6,20.125
  other v2: 30.3,2.7 33.5,2.7 15.275,3.275 18.175,3.275 12.95,3.875 30.3,4.1 33.5,4.1 9.375,4.475 10.55,4.475 11.75,4.475 12.95,4.475 14.15,4.475 16.575,4.475 22.7,4.7 15.5,5.2 30.3,5.5 33.5,5.5 31.55,6.875 36.375,6.875 14.525,7.05 32,8.2 28.55,8.775 8.975,9.25 37.75,11.025 8.15,11.45 30.85,11.8 32,11.8 33.15,11.8 34.3,11.8 35.45,11.8 36.6,11.8 28.55,12.175 10.025,12.475 8.15,13.95 33.9,15.2 21.875,15.575 28.55,15.575 24.95,17.15 26.15,17.15 28.575,17.15 17.875,17.25 33.9,17.3 19.8,17.35 20.6,17.35 21.6,17.35 22.425,17.35 23.2,17.35 24,17.35 24.95,17.775 26.15,17.775 27.35,17.775 28.575,17.775 24.95,18.35 28.575,18.35 25.575,18.975 29.15,18.975 13.1,19.35 10.7,19.575 25.575,19.575 29.15,19.575 26.775,19.65 27.95,19.65 6.95,22.125
  other v3: 11.35,2.675 16.85,2.675 49.2,4.125 47.775,4.3 47.775,5.45 41.125,6.025 45.275,6.025 17.85,8.05 45.125,8.975 32.575,9.675 34.175,9.675 15.8,10.525 13.925,11.525 31.775,12.875 33.375,12.875 34.975,12.875 31.775,14.475 38.175,14.475 15.375,14.85 18.15,16.775 30.35,16.775 31.575,16.775 27.775,16.85 33.55,16.875 46.75,17.325 30.775,17.35 4.6,20.125
  other v4: 11.35,2.675 16.85,2.675 49.2,4.125 47.775,4.3 47.775,5.45 41.125,6.025 45.275,6.025 17.85,8.05 45.125,8.975 32.575,9.675 34.175,9.675 13.925,11.525 31.775,12.875 33.375,12.875 34.975,12.875 31.775,14.475 38.175,14.475 15.375,14.85 18.15,16.775 30.35,16.775 31.575,16.775 27.775,16.85 33.55,16.875 46.75,17.325 30.775,17.35 4.6,20.125
  other v5: 11.35,2.675 16.85,2.675 49.2,4.125 47.775,4.3 47.775,5.45 41.125,6.025 45.275,6.025 17.85,8.05 45.125,8.975 32.575,9.675 34.175,9.675 15.8,10.525 13.925,11.525 31.775,12.875 33.375,12.875 34.975,12.875 31.775,14.475 38.175,14.475 15.375,14.85 18.15,16.775 30.35,16.775 31.575,16.775 27.775,16.85 33.55,16.875 46.75,17.325 30.775,17.35 4.6,20.125
  other v6: 19.9,7.43 20.4,7.93 22.4,7.93 20.9,9.43 22.9,9.93 23.4,9.93 27.9,10.43 25.9,10.93 22.9,11.43 23.4,11.43 25.9,11.43 28.9,11.43 22.9,11.93 23.4,11.93 25.9,11.93 20.9,12.43 23.4,12.43 25.4,12.43 25.9,12.43 25.4,12.93 25.9,12.93 20.9,13.93 28.9,13.93 22.9,14.93 23.9,15.43 24.9,15.43 26.4,15.43 28.9,15.43
  other v7: 19.9,7.43 20.4,7.93 22.4,7.93 20.9,9.43 22.9,9.93 23.4,9.93 27.9,10.43 25.9,10.93 22.9,11.43 23.4,11.43 25.9,11.43 28.9,11.43 22.9,11.93 23.4,11.93 25.9,11.93 20.9,12.43 23.4,12.43 25.4,12.43 25.9,12.43 25.4,12.93 25.9,12.93 20.9,13.93 28.9,13.93 22.9,14.93 23.9,15.43 24.9,15.43 26.4,15.43 28.9,15.43
  other v9: 19.9,7.43 20.4,7.93 22.4,7.93 20.9,9.43 22.9,9.93 23.4,9.93 27.9,10.43 25.9,10.93 22.9,11.43 23.4,11.43 25.9,11.43 28.9,11.43 22.9,11.93 23.4,11.93 25.9,11.93 20.9,12.43 23.4,12.43 25.4,12.43 25.9,12.43 25.4,12.93 25.9,12.93 20.9,13.93 28.9,13.93 22.9,14.93 23.9,15.43 24.9,15.43 26.4,15.43 28.9,15.43
  other v10: 24.225,15.575 26.525,15.75 27.55,17.2 30.4,17.3
VCCADC: C123.1 C124.1 L7.2 U1.C13 | length 17.2
  Top Layer w0.15: L7.2@21.175,18.275 25.05,18.275 25.425,18.65 25.45,18.65 25.475,18.675 25.725,18.675 v8(26.053,18.3)
  L3-SIG w0.15: v1(20.425,11.15) 20.5,11.15 20.65,11 20.675,11 20.7,10.975 20.725,10.975 20.75,10.95 21.225,10.95 v1(21.75,10.425)
  L4-SIG w0.15: v3(20.25,17) v1(20.475,17.575) ; v3(20.375,11.85) v1(20.425,11.15) ; v1(21.75,10.425) v9(23.15,9.025) ; v1@22.9,7.925 v3(23.125,8.25)
  L5-VCC3V3 w0.2: v8(26.053,18.3) v10(26.435,18.505)
  Bottom Layer w0.15: v3(20.25,17) 20.25,12.1 20.275,12.075 20.275,12.05 20.325,12 20.325,11.9 v3(20.375,11.85) ; v3(23.125,8.25) C123.1@23.25,8.775 ; v9(23.15,9.025) C123.1@23.25,9 ; v8(26.053,18.3) C124.1@26.4,18.47
  other v1: 22.9,7.93
  other v2: 23.125,8.25 20.375,11.85 20.25,17
  other v4: 20.475,17.575
  other v5: 20.475,17.575
  other v6: 22.9,7.93
  other v7: 22.9,7.93
  other v10: 23.15,9.025
VU: C78.2 C147.2 C148.2 C149.2 C160.2 C167.2 L8.2 R26.1 R108.1 U7.1 U8.1 U8.5 U8.11 U8.18 U8.24 | length 64.1
  Top Layer w0.4: v8(4.25,16.275) 5.2,16.275 5.5,16.575 5.525,16.575 5.55,16.6 5.575,16.6 5.6,16.625 8.05,16.925 ; 7.315,16.835 v8(7.922,17.932) ; v8(8.36,15.17) 8.3,15.6 ; v8(8.53,20.095) 8.975,20.575 9,20.6 9,20.625 9.025,20.65 9.025,20.675 9.175,20.825 10.175,20.825 ; 8.8,16.975 v8(7.922,17.932) ; v8(8.81,15.17) 8.8,15.6 8.8,16.625 8.775,16.65 8.775,16.675 8.75,16.7 8.75,16.725 8.5,16.975 8.15,16.975 8.125,16.95 8.1,16.95 8.05,16.925 ; v8(10.3,20.31) 10.175,20.825 ; v8(13.002,17.5) 13.84,16.25 ; v8(14.1,14.3) 13.84,15.05 13.84,16.25 ; v8(14.62,17.625) 14.475,17.5 ; v8(7.922,17.932) 8.6,19.175 ; v8(7.922,17.932) 8.8,17.5 ; v8(7.922,17.932) 8.05,16.925 ; 8.3,15.6 8.375,15.85 ; 8.3,15.6 8.375,15.85 ; 8.375,15.85 8.75,16.225 ; 8.375,15.85 8.75,16.225 ; 8.6,19.175 8.6,19.2 8.575,19.225 8.575,19.25 8.55,19.275 8.55,20.2 9.125,20.775 9.175,20.8 9.2,20.8 9.225,20.825 10.175,20.825 ; 8.6,19.175 8.8,18.975 8.8,16.325 ; 8.75,16.225 8.75,16.25 ; 8.75,16.225 8.75,16.25 ; 8.75,16.25 8.775,16.275 ; 8.75,16.25 8.775,16.275 ; 8.775,16.275 8.775,16.3 ; 8.775,16.275 8.775,16.3 ; 8.775,16.3 8.8,16.325 ; 8.775,16.3 8.8,16.325 ; 8.8,16.325 8.8,17.5 ; 8.8,17.5 12.775,17.5 14.475,17.5 ; 13.84,16.25 14.475,17 14.475,17.5
  L3-SIG w0.25: v2(7.49,4.15) v8(7.65,4.825)
  L4-SIG w0.2: v3(3.075,8.85) v3(3.475,10.2)
  L4-SIG w0.3: v2(10.625,10.6) 11.35,10.6 11.75,11 11.75,12.45 v3(12.25,12.95)
  L4-SIG w0.4: v8(7.922,17.932) v10(8.375,17.55)
  L5-VCC3V3 w0.25: v2(7.49,4.15) v8(7.65,4.825)
  Bottom Layer w0.25: U8.24@11.25,14.9 11.25,14.3 11.95,14.3
  Bottom Layer w0.3: R108.1@10.85,10.8 C167.2@10.95,11.3 ; L8.2@11.95,13.5 11.95,14.3
  Bottom Layer w0.4: C78.2@3,12.025 3.075,12.3 ; v3(3.075,8.85) 3.075,8.75 3.1,8.725 3.1,8.7 3.125,8.675 3.125,8.65 5.5,6.275 5.55,6.25 5.575,6.25 5.6,6.225 v8(7.65,4.825) ; v3(3.475,10.2) 3.475,10.65 3.125,11 3.1,11.05 3.1,11.075 3.075,11.1 3.075,12.3 ; C149.2@3.95,12.65 U7.1@4.425,12.65 ; C149.2@3.95,13.825 3.95,15.825 4.225,16.225 4.25,16.25 v8(4.25,16.275) ; C148.2@8.2,20.375 8.275,20.35 v8(8.53,20.095) ; v8(8.36,15.17) U8.1@8.3,15.6 ; U8.1@8.8,15.6 v8(8.81,15.17) ; U8.11@10.3,19.95 v8(10.3,20.31) ; U8.18@12.73,17.5 v8@12.965,17.5 ; L8.2@14.1,13.6 v8(14.1,14.3) ; v8(14.62,17.625) 14.9,18.775 C160.2@15,18.975 ; 3.075,12.3 3.1,12.325 ; 3.075,12.3 3.1,12.325 ; 3.1,12.325 3.1,12.35 ; 3.1,12.325 3.1,12.35 ; 3.1,12.35 3.125,12.4 ; 3.1,12.35 3.125,12.4 ; 3.125,12.4 C149.2@3.225,12.5 ; 3.125,12.4 C149.2@3.225,12.5 ; C149.2@3.225,12.5 C149.2@3.25,12.5 ; C149.2@3.225,12.5 C149.2@3.25,12.5 ; C149.2@3.25,12.5 C149.2@3.275,12.525 ; C149.2@3.25,12.5 C149.2@3.275,12.525 ; C149.2@3.275,12.525 C149.2@3.3,12.525 ; C149.2@3.275,12.525 C149.2@3.3,12.525 ; C149.2@3.3,12.525 C149.2@3.325,12.55 ; C149.2@3.3,12.525 C149.2@3.325,12.55 ; C149.2@3.325,12.55 4.425,12.55 C149.2@3.325,12.55 ; U8.1@8.3,15.6 8.325,15.6 U8.1@8.3,15.6 ; U8.18@12.675,17.5 12.775,17.5 U8.18@12.675,17.5
  Bottom Layer w0.8: L8.2@13.9,13.2 C147.2@14.6,13.2
  other v1: 7.49,4.15
  other v2: 3.075,8.85 3.475,10.2 12.25,12.95
  other v3: 7.49,4.15 10.625,10.6
  other v9: 8.375,17.55
WE#: U1.V5 U3.F9 | length 13.7
  Top Layer w0.076: U1.V5@26.95,15.35 27.025,15.175 27.125,15.075 27.125,15.05 27.15,15.025 27.15,14.825 27.225,14.75 27.225,14.725 v4(27.325,14.525) ; v6(27.625,12.675) 27.65,12.7 27.65,13.025 27.675,13.05 27.675,13.075 27.775,13.175 28,13.175 28.15,13.325 28.15,13.55 28.275,13.675 28.5,13.675 28.65,13.825 28.65,14.05 28.775,14.175 29.425,14.175 29.7,14.45 31.4,14.45 31.7,14.15 31.925,14.15 31.95,14.125 31.975,14.125 32.1,14 32.1,13.975 32.125,13.95 32.125,13.825 32.45,13.5 32.7,13.5 32.725,13.525 32.75,13.525 32.775,13.55 32.8,13.55 32.875,13.625 32.875,13.65 32.925,13.7 32.925,13.825 33.4,14.3 33.5,14.3 33.55,14.325 33.575,14.35 33.6,14.35 33.675,14.425 33.675,14.45 33.725,14.5 33.725,14.675 34.325,15.275 34.575,15.275 35.3,15.025 U3.F9@35.65,14.675
  L3-SIG w0.1: v4(27.325,14.525) 27.575,12.9 27.6,12.825 v6(27.625,12.675)
  other v5: 27.325,14.525
  other v7: 27.625,12.675
pads on no net: U1.A2 U1.A8 U1.A10 U1.A16 U1.A17 U1.B2 U1.B8 U1.B10 U1.B15 U1.D1 U1.D2 U1.E19 U1.J17 U1.J18 U1.K18 U1.T17 U1.T18 U1.U3 U1.U18 U1.U19 U1.V15 U1.V19 U1.W6 U1.W7 U1.W13 U1.W17 U1.W19 U2.3 U2.23 U2.24 U2.26 U2.27 U2.28 U2.29 U2.30 U2.32 U2.33 U2.34 U2.36 U2.44 U2.45 U2.46 U2.48 U2.52 U2.53 U2.54 U2.55 U2.57 U2.58 U2.59 U2.EP U3.E2 U4.EP U8.22 U10.6 U10.7 U10.EP X1.4 X2. X3.A X3.B X4.MP1 X4.MP2

## Polygon pours and split planes (outlines as drawn)
GND on L2-GND "L2_GND_FEATHER" (solid, remove dead copper, pour order 2): 0.25,2.54 0.25,20.32 cw(c2.54,20.32) 2.54,22.61 48.26,22.61 cw(c48.26,20.32) 50.55,20.32 50.55,2.54 cw(c48.26,2.54) 48.26,0.25 2.54,0.25 cw(c2.54,2.54)
VCC3V3 on L5-VCC3V3 "L5_VCC3V3_FEATHER" (solid, remove dead copper, pour order 3): 0.25,2.54 0.25,20.32 cw(c2.54,20.32) 2.54,22.61 48.26,22.61 cw(c48.26,20.32) 50.55,20.32 50.55,2.54 cw(c48.26,2.54) 48.26,0.25 2.54,0.25 cw(c2.54,2.54)

## Silkscreen, mask and mechanical layers (free items; w line width, h text height)
Top Overlay:
  text "BAT" at 15.443,19.541 h0.8
  text "EN" at 18.383,19.541 h0.8
  text "USB" at 20.523,19.541 h0.8
  text "D13" at 23.13,19.541 h0.8
  text "D12" at 25.67,19.541 h0.8
  text "D11" at 28.343,19.541 h0.8
  text "D10" at 30.75,19.541 h0.8
  text "D9" at 33.623,19.541 h0.8
  text "D6" at 36.163,19.541 h0.8
  text "D5" at 38.703,19.541 h0.8
  text "SCL" at 40.823,19.541 h0.8
  text "SDA" at 43.403,19.541 h0.8
  text "X1" at 2.25,17.35 h0.8
  text "U2" at 12.852,12.752 h0.8
  text "ASAR" at 39.9,9.95 h1.2
  text "A7" at 41.1,8.25 h1.2
  text "BTN" at 42.25,6.995 h0.8
  text "A1" at 18.975,3.925 h0.8
  text "A5" at 28.543,2.519 h0.8
  text "SCK" at 30.683,2.519 h0.8
  text "MO" at 33.623,2.519 h0.8
  text "MI" at 36.297,2.519 h0.8
  text "RX" at 38.703,2.519 h0.8
  text "TX" at 41.243,2.519 h0.8
  text "D4" at 43.783,2.519 h0.8
  text "A4" at 27.75,2.5 h0.8 r90
  text "RS" at 3.765,0.415 h0.8
Mechanical 1:
  the board outline again, w0.1

## Text inside footprints (layer, text, board x,y; h text height)
U$2: Mechanical 3 "CC" at 54.968,-5.27 h3.94
U$3: Mechanical 3 "BY" at 61.312,-9.334 h2.76
U$4: Mechanical 3 "SA" at 65.868,-9.334 h2.76
U$5: Mechanical 3 "C" at 71.857,-5.93 h5.91